# Altium PCB poyu.pcbdoc (part 1 of 2)
Units mm, origin at the board's own origin, x right, y up, seen from the top; angles counter-clockwise.
Board outline 44.28 x 42.46 mm, 4 copper layers (Top Layer, GND, VCC, Bottom Layer), stack 1.564 mm thick; 93 components, 51 nets, 337 pads, 150 vias.
Unrouted connection lines stored in the file: 71.
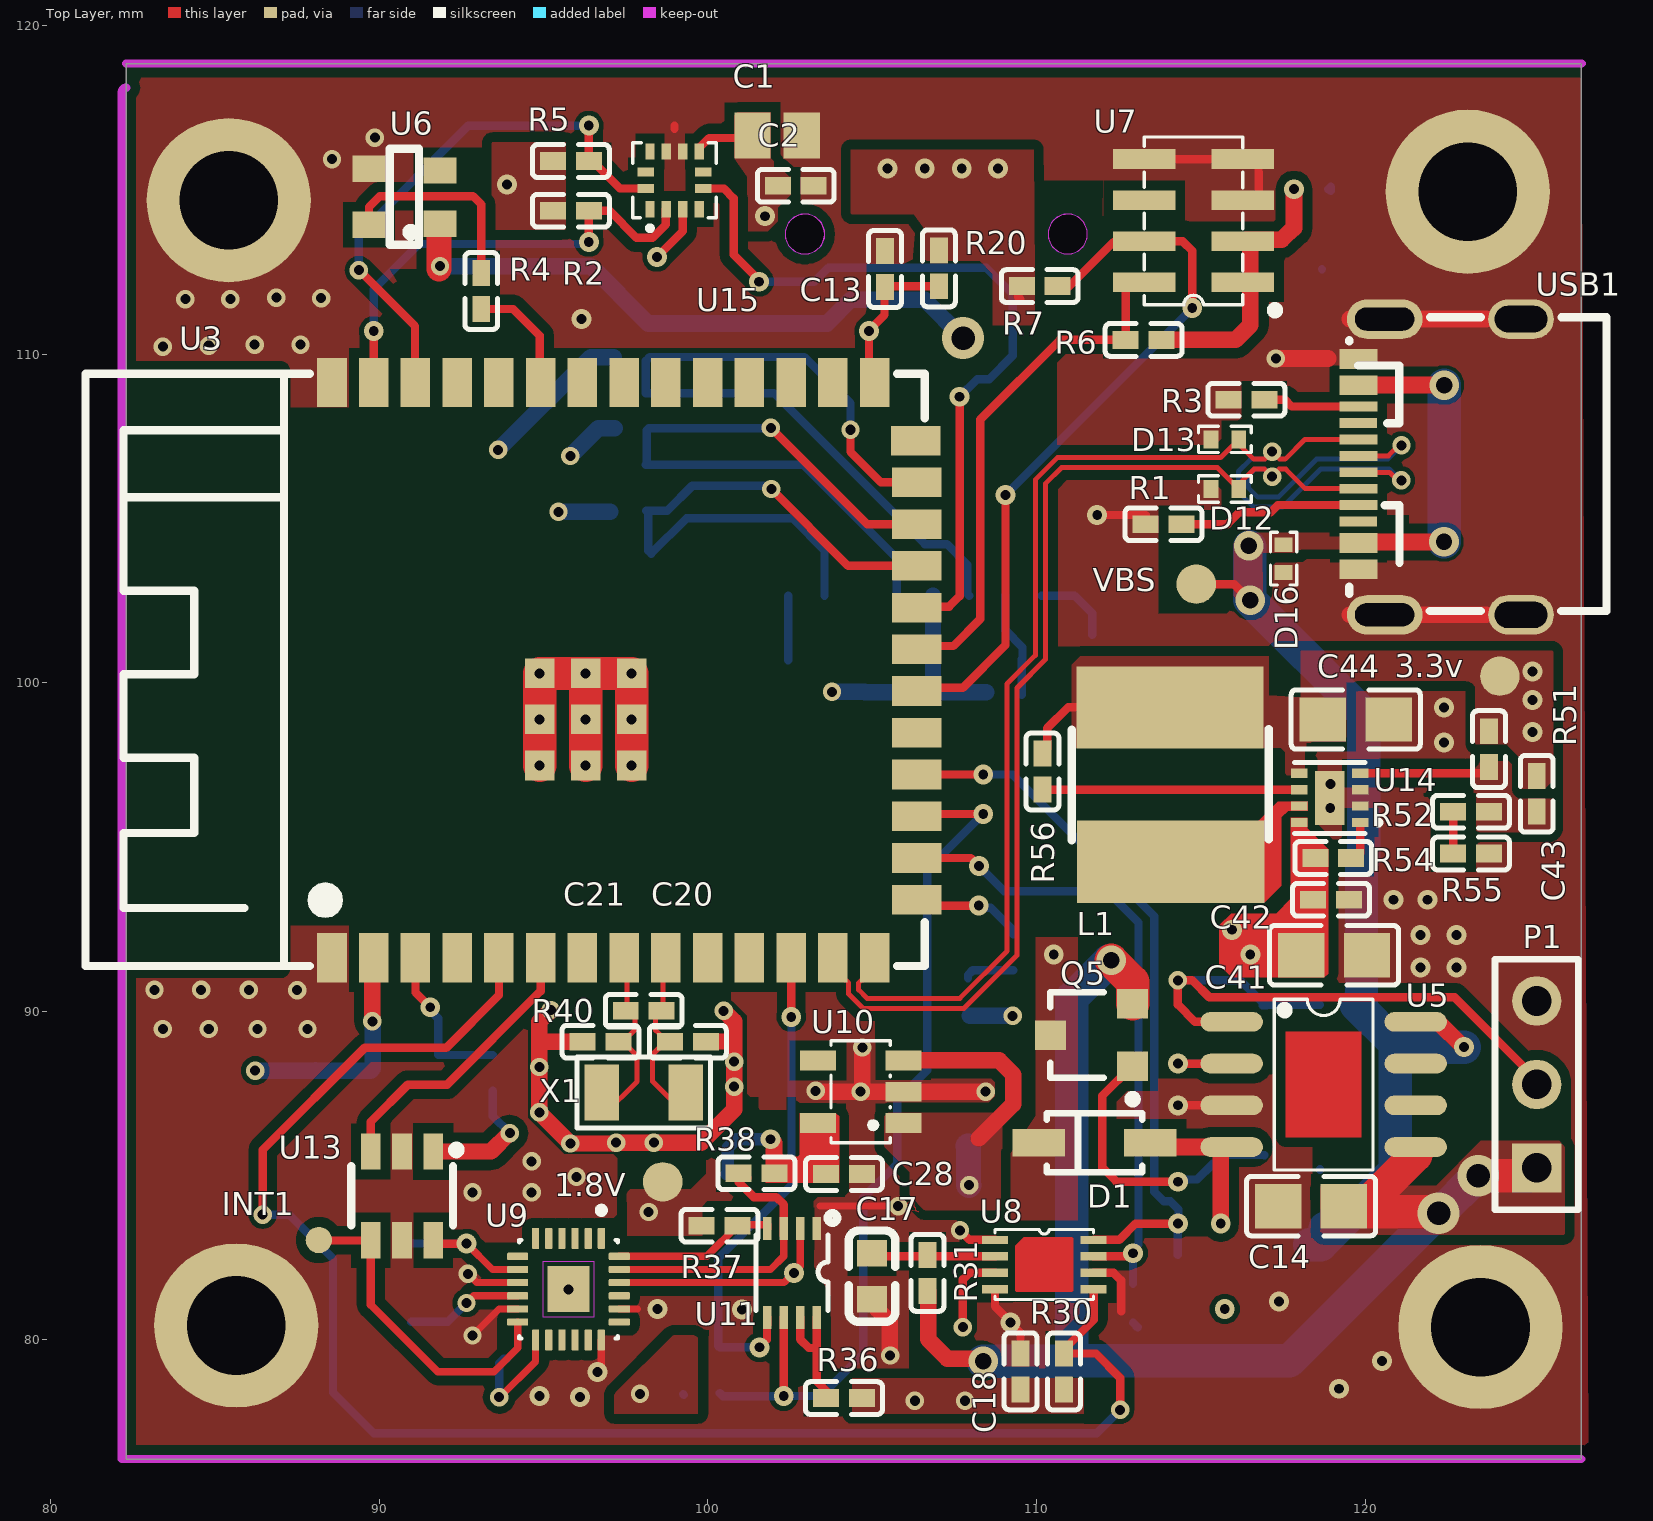
[diagram p0: Top Layer view]
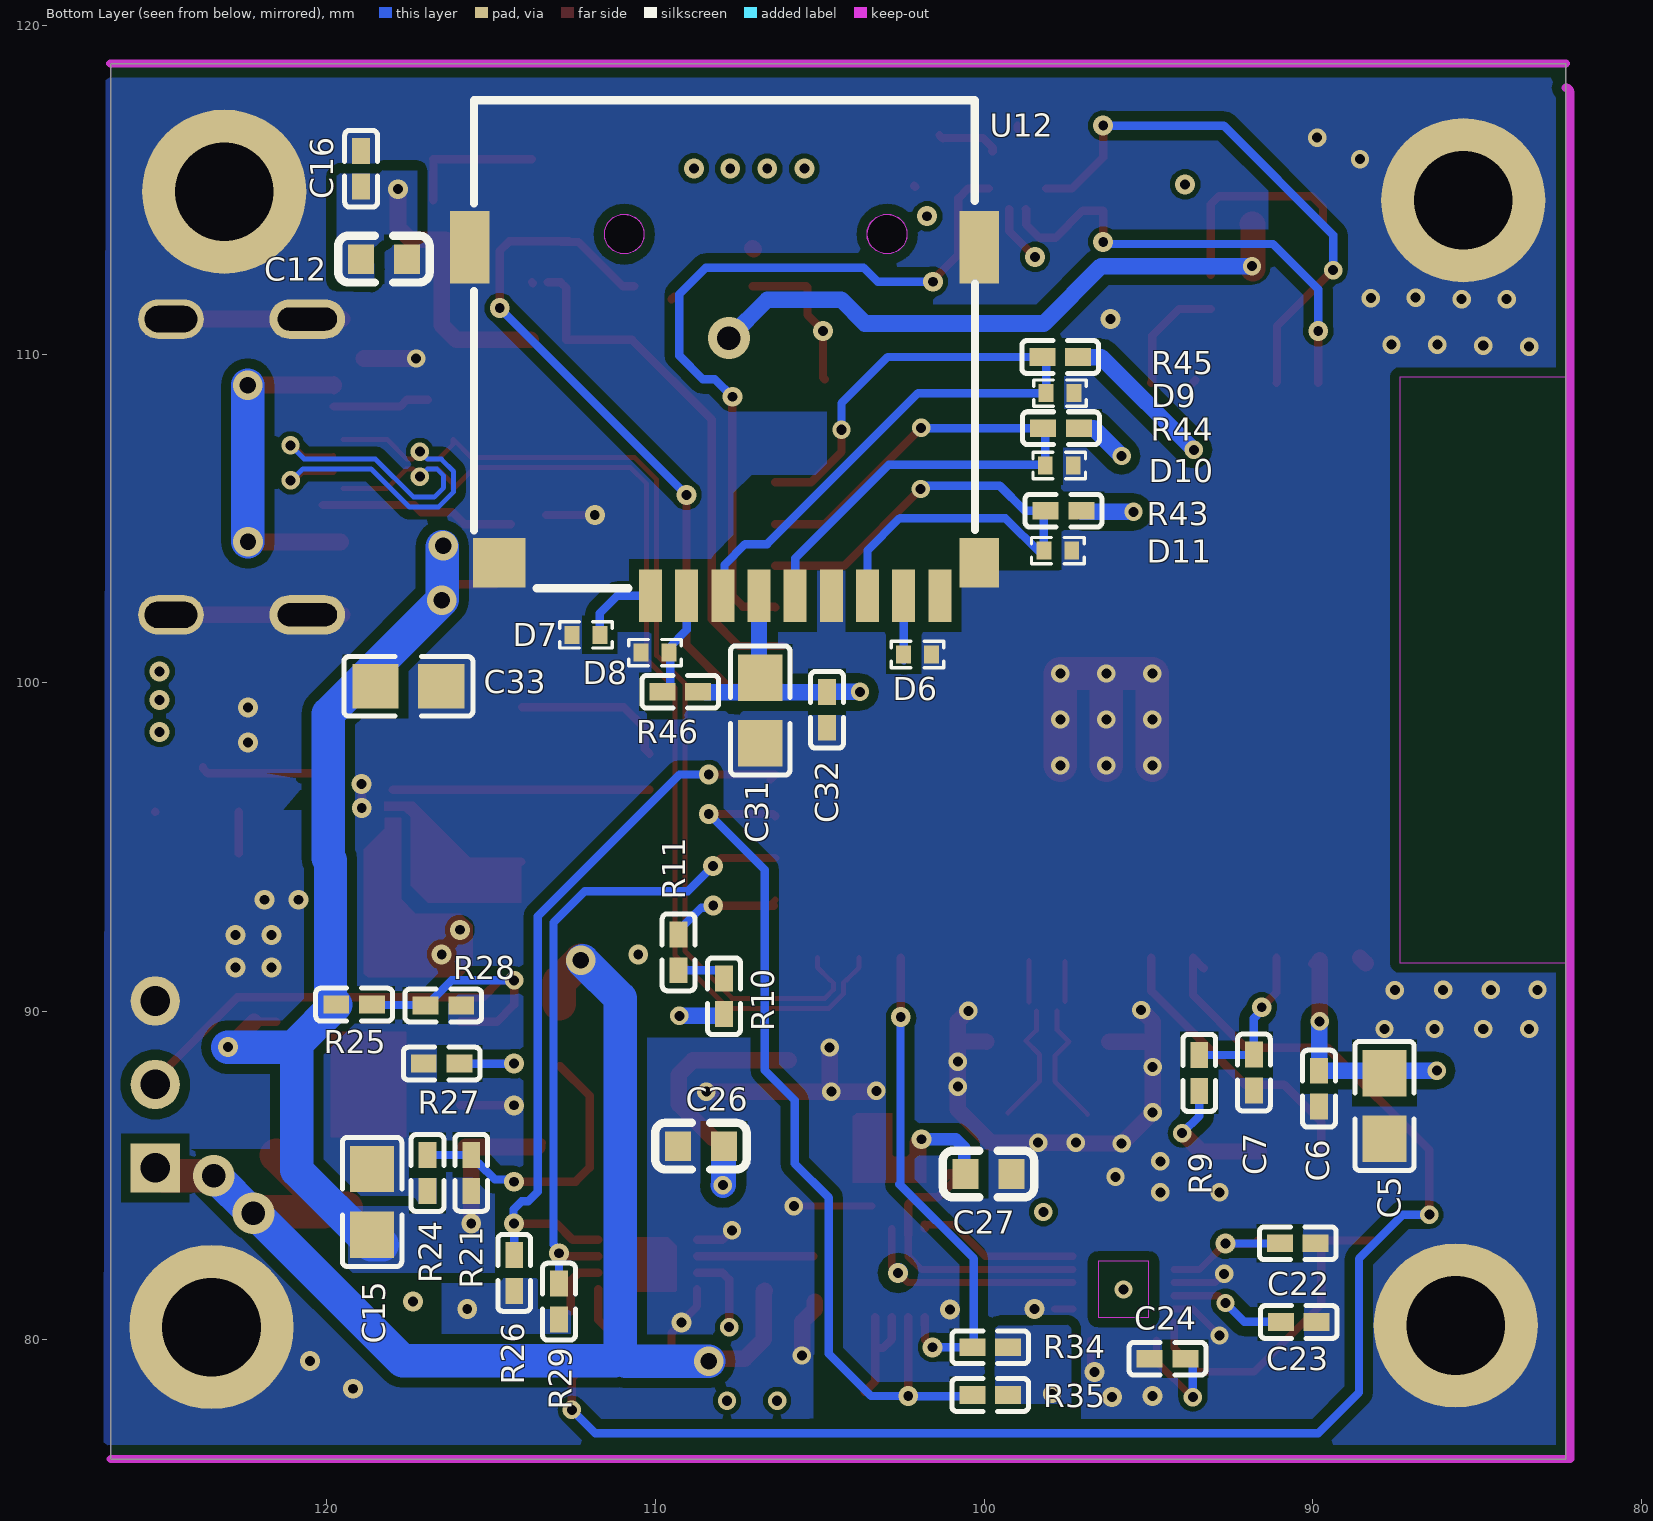
[diagram p1: Bottom Layer view, seen from below]
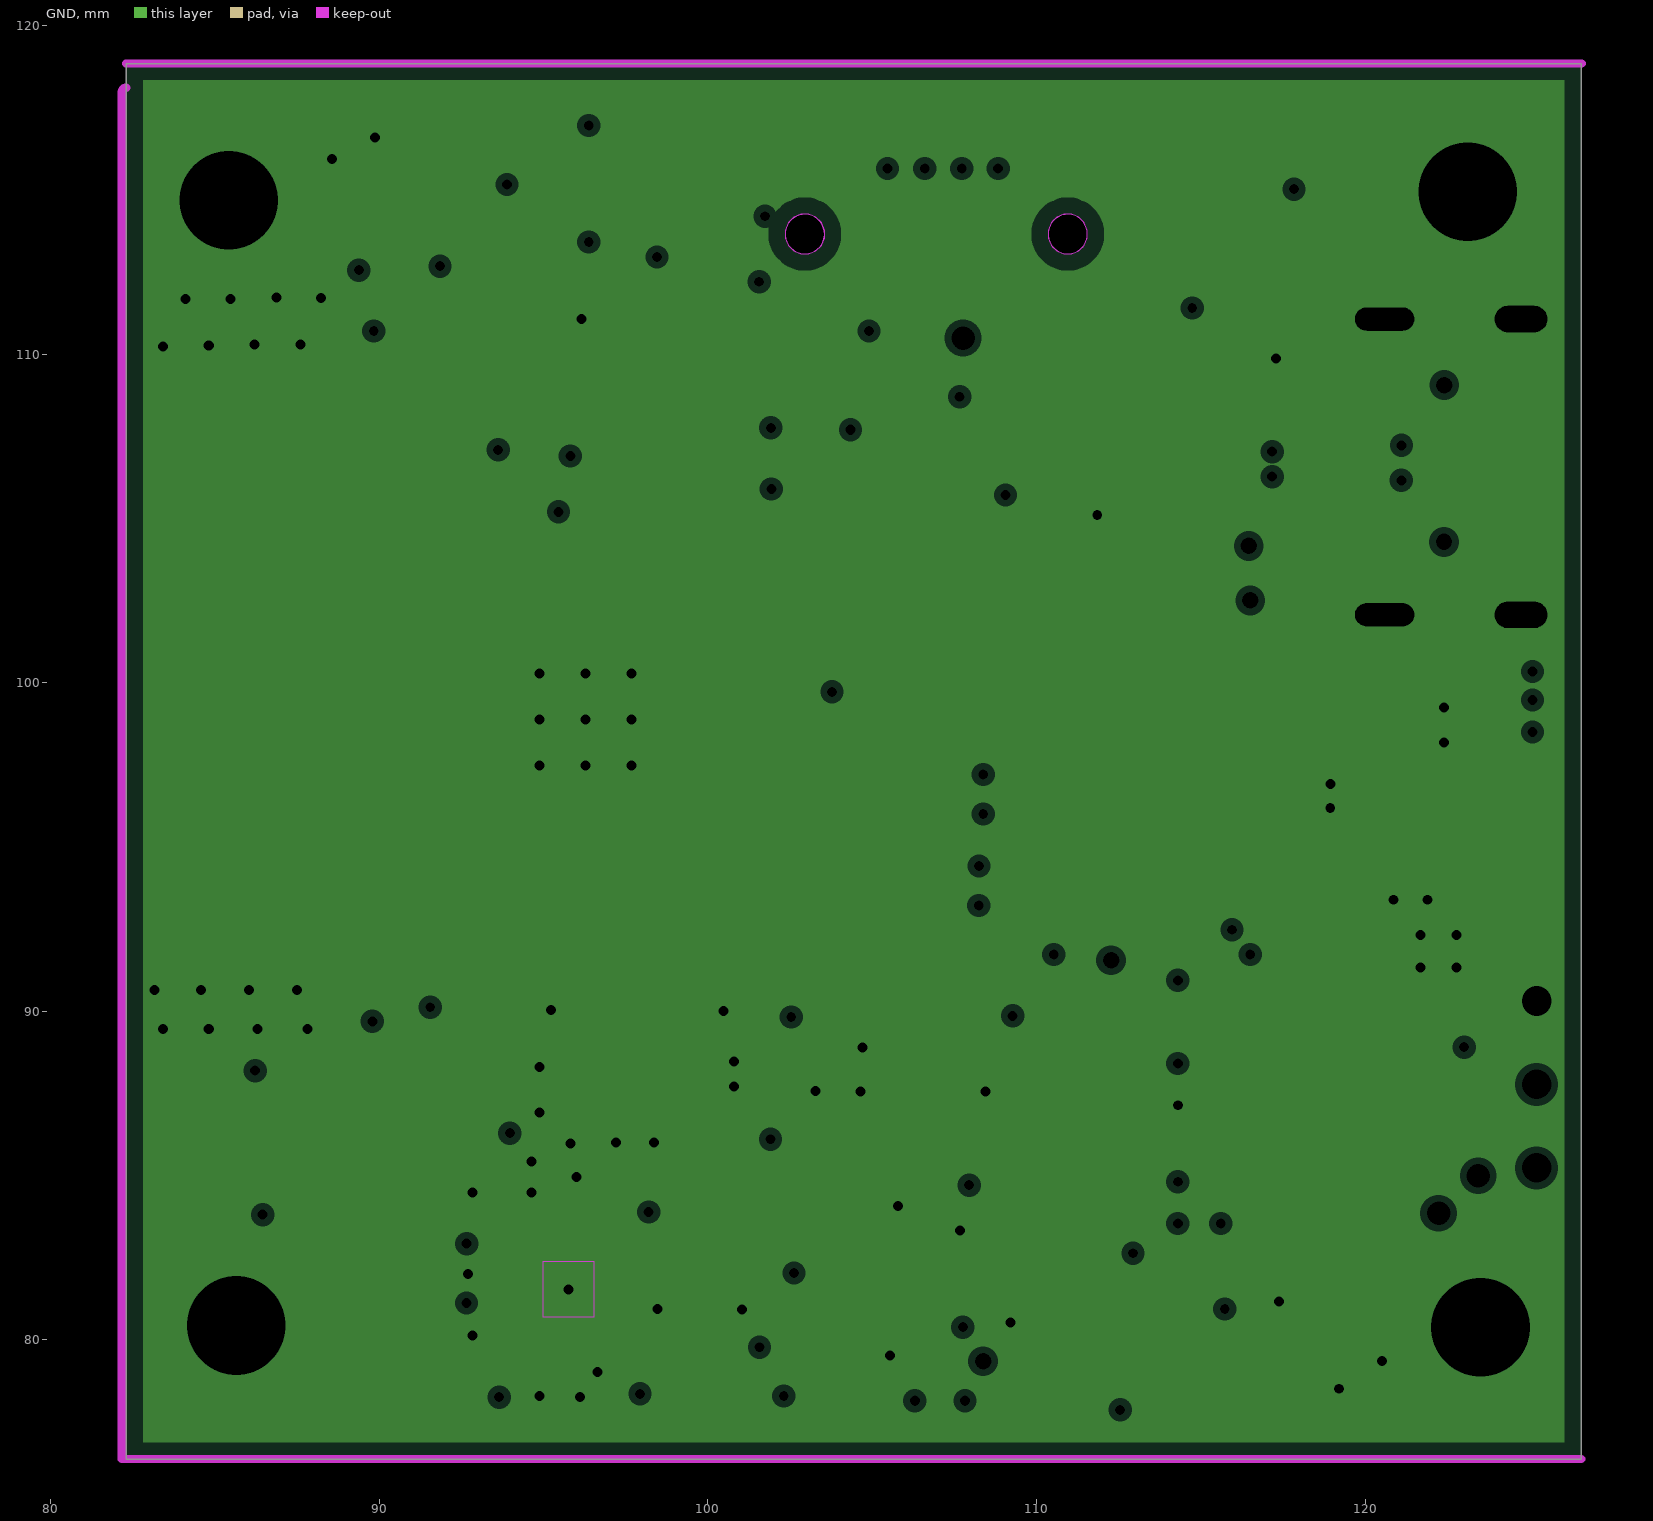
[diagram p2: GND, clearances drawn from the general rule]
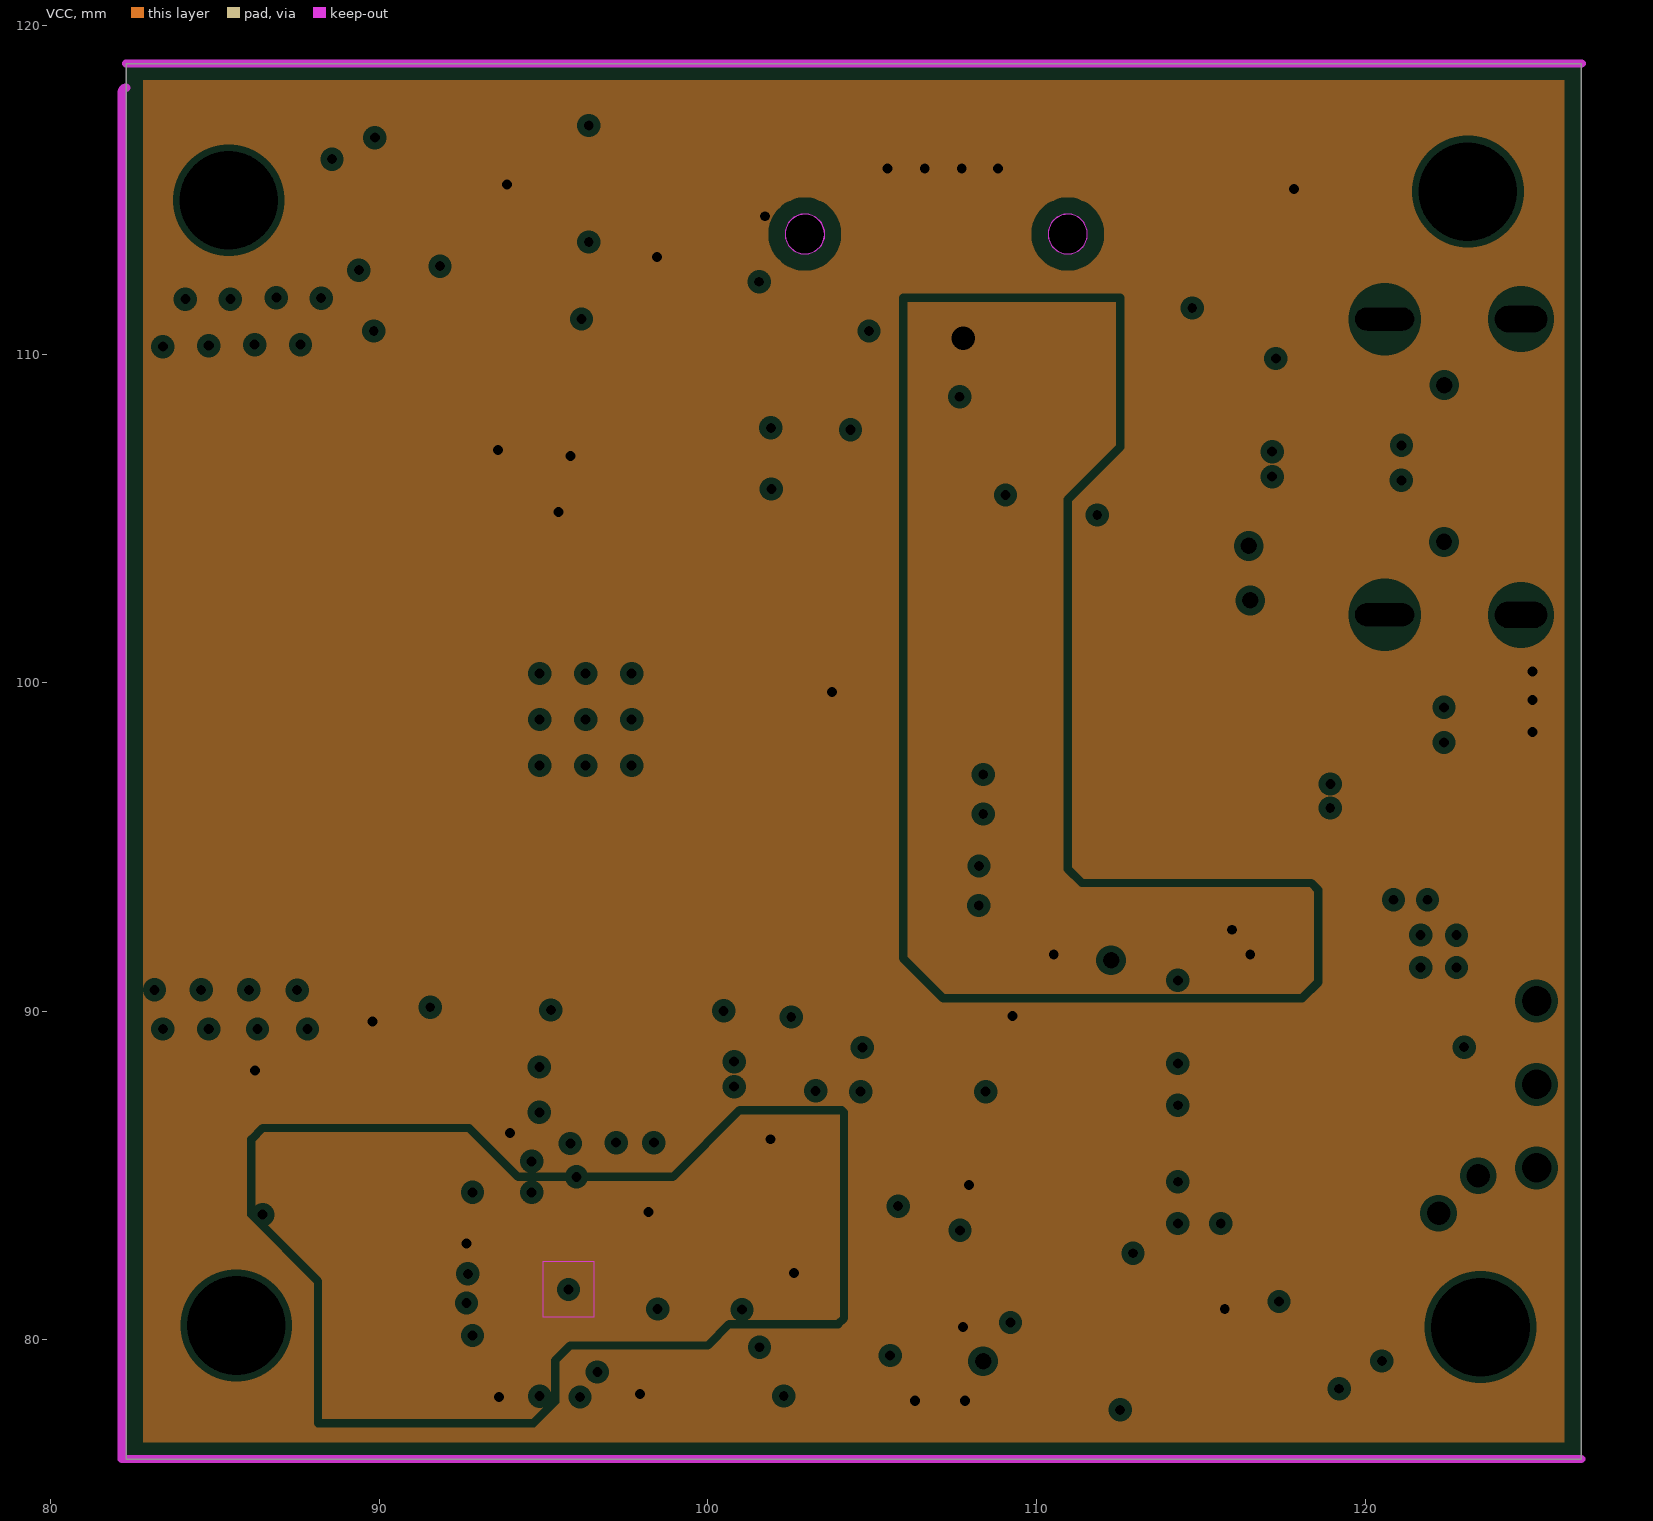
[diagram p3: VCC, clearances drawn from the general rule]

## Layer stack, top to bottom
Top Solder Mask Layer: solder mask 0.0102, Solder Resist, Dk 3.5
Top Layer: signal copper 0.035
Dielectric 1: prepreg 0.0993, PP-006, Dk 4.1
GND: plane copper 0.0152, net GND
Dielectric1: dielectric 1.2649, FR-4, Dk 4.8
VCC: plane copper 0.0152, net (Multiple Nets)
Dielectric 2: prepreg 0.0993, PP-006, Dk 4.1
Bottom Layer: signal copper 0.035
Bottom Solder Mask Layer: solder mask 0.0102, Solder Resist, Dk 3.5

## Board outline
82.296,76.378 126.576,76.378 126.576,118.842 82.296,118.842

## Design rules (kind name [scope] priority, off if disabled: settings)
Clearance KEEPOUT-PAD-100mil [OnLayer('Keep-Out Layer') vs ispad] p1 off: gap=2.54 ignorepadtopadclearanceinfootprint=FALSE except(0: Arc-Hole Track-Hole SMDPad-Hole THPad-Hole Via-Hole Fill-Hole Poly-Hole Region-Hole Text-Hole)
Clearance VIA-VIA-18mil [isVIA >(InDifferentialPairClass('All Differential Pairs')or  InNet('GND') ) vs isVIA] p2 off: gap=0.457 ignorepadtopadclearanceinfootprint=FALSE except(0: Arc-Hole Track-Hole SMDPad-Hole THPad-Hole Via-Hole Fill-Hole Poly-Hole Region-Hole Text-Hole)
Clearance KEEPOULAYER-ALL-20mil [OnLayer('Keep-Out Layer')] p3: gap=0.508 ignorepadtopadclearanceinfootprint=FALSE except(0: Arc-Hole Track-Hole SMDPad-Hole THPad-Hole Via-Hole Fill-Hole Poly-Hole Region-Hole Text-Hole)
Clearance BOTTOMPADS-4MM [(InComponentClass('Top Side Components')) and  (OnLayer('Multi-Layer')) vs OnLayer('Bottom Layer') And IsPad] p4 off: gap=4.064 ignorepadtopadclearanceinfootprint=FALSE except(0: Arc-Hole Track-Hole SMDPad-Hole THPad-Hole Via-Hole Fill-Hole Poly-Hole Region-Hole Text-Hole)
Clearance room_bga_3.9mil [withinroom('bga_3.9mil')] p5 off: gap=0.102 ignorepadtopadclearanceinfootprint=FALSE except(0: Arc-Hole Track-Hole SMDPad-Hole THPad-Hole Via-Hole Fill-Hole Poly-Hole Region-Hole Text-Hole)
Clearance 3W>dif>pwr--12MIL [istrack  >(InDifferentialPairClass('All Differential Pairs')or InNetClass('pwr') ) vs istrack  >(InDifferentialPairClass('All Differential Pairs')or InNetClass('pwr') )] p6 off: gap=0.305 ignorepadtopadclearanceinfootprint=FALSE except(0: Arc-Hole Track-Hole SMDPad-Hole THPad-Hole Via-Hole Fill-Hole Poly-Hole Region-Hole Text-Hole)
Clearance CLK--16MIL [InNetClass('CLK')] p7 off: gap=0.406 ignorepadtopadclearanceinfootprint=FALSE except(0: Arc-Hole Track-Hole SMDPad-Hole THPad-Hole Via-Hole Fill-Hole Poly-Hole Region-Hole Text-Hole)
Clearance inpoly-isvia--6MIL [inpoly vs isvia] p8: gap=0.152 ignorepadtopadclearanceinfootprint=FALSE except(0: Arc-Hole Track-Hole SMDPad-Hole THPad-Hole Via-Hole Fill-Hole Poly-Hole Region-Hole Text-Hole)
Clearance inpoly-all--12MIL [inpoly] p9: gap=0.305 ignorepadtopadclearanceinfootprint=FALSE except(0: Arc-Hole Track-Hole SMDPad-Hole THPad-Hole Via-Hole Fill-Hole Poly-Hole Region-Hole Text-Hole)
Clearance all--6MIL [All] p10: gap=0.152 ignorepadtopadclearanceinfootprint=FALSE except(0: Arc-Hole Track-Hole SMDPad-Hole THPad-Hole Via-Hole Fill-Hole Poly-Hole Region-Hole Text-Hole)
Clearance ALL-5MIL [All] p11 off: gap=0.127 ignorepadtopadclearanceinfootprint=FALSE except(0: Arc-Hole Track-Hole SMDPad-Hole THPad-Hole Via-Hole Fill-Hole Poly-Hole Region-Hole Text-Hole)
Clearance ALL-4MIL [All] p12 off: gap=0.102 ignorepadtopadclearanceinfootprint=FALSE except(0: Arc-Hole Track-Hole SMDPad-Hole THPad-Hole Via-Hole Fill-Hole Poly-Hole Region-Hole Text-Hole)
Clearance poly-4mil [InPolygonClass('Poly-4mil')] p13 off: gap=0.102 ignorepadtopadclearanceinfootprint=FALSE except(0: Arc-Hole Track-Hole SMDPad-Hole THPad-Hole Via-Hole Fill-Hole Poly-Hole Region-Hole Text-Hole)
DiffPairsRouting DiffPair_DiffPairsRouting [All] p1: maxlimit=0.152 minlimit=0.152 mostfreqgap=0.152 toplayer_minwidth=0.152 toplayer_maxwidth=0.152 toplayer_prefwidth=0.152 bottomlayer_minwidth=0.152 bottomlayer_maxwidth=0.152 bottomlayer_prefwidth=0.152 maxuncoupledlength=12.7
DiffPairsRouting USBD_DiffPairsRouting [InDifferentialPair ('USBD')] p2: maxlimit=0.152 minlimit=0.152 mostfreqgap=0.152 toplayer_minwidth=0.152 toplayer_maxwidth=0.152 toplayer_prefwidth=0.152 bottomlayer_minwidth=0.152 bottomlayer_maxwidth=0.152 bottomlayer_prefwidth=0.152 maxuncoupledlength=12.7
DiffPairsRouting 90oum [All] p3: maxlimit=0.254 minlimit=0.254 mostfreqgap=0.254 toplayer_minwidth=0.381 toplayer_maxwidth=0.381 toplayer_prefwidth=0.381 bottomlayer_minwidth=0.381 bottomlayer_maxwidth=0.381 bottomlayer_prefwidth=0.381 maxuncoupledlength=12.7
DiffPairsRouting 100oum [All] p4: maxlimit=0.254 minlimit=0.254 mostfreqgap=0.254 toplayer_minwidth=0.381 toplayer_maxwidth=0.381 toplayer_prefwidth=0.381 bottomlayer_minwidth=0.381 bottomlayer_maxwidth=0.381 bottomlayer_prefwidth=0.381 maxuncoupledlength=12.7
FabricationTestPointUsage TestPointUsage [All] p1: valid=0 allowmultiple=FALSE
FabricationTestpoint Testpoint [All] p1: side=3 testpointundercomponent=TRUE minsize=1.016 maxsize=2.54 preferedsize=1.524 minholesize=0 maxholesize=1.016 preferedholesize=0.813 testpointgrid=0.025 allowsidetop=TRUE allowsidebottom=TRUE usegrid=TRUE gridtolerance=0
MatchedLengths DiffPair_MatchedLengths [All] p1: tolerance=25.4 checknetsindiffpair=TRUE checkdiffpairvsdiffpair=FALSE checkxsignals=FALSE checkothers=FALSE
MatchedLengths USBD_MatchedLengths [InDifferentialPair ('USBD')] p2: tolerance=25.4 checknetsindiffpair=TRUE checkdiffpairvsdiffpair=FALSE checkxsignals=FALSE checkothers=FALSE
MatchedLengths USBD_MatchedLengths_1 [InDifferentialPair ('USBD')] p3: tolerance=25.4 checknetsindiffpair=FALSE checkdiffpairvsdiffpair=TRUE checkxsignals=TRUE checkothers=TRUE
MatchedLengths USBD_MatchedLengths_2 [InDifferentialPair ('USBD')] p4: tolerance=25.4 checknetsindiffpair=TRUE checkdiffpairvsdiffpair=FALSE checkxsignals=FALSE checkothers=FALSE
MatchedLengths XTALD_MatchedLengths [InDifferentialPairClass('XTALD')] p5: tolerance=0.178 checknetsindiffpair=TRUE checkdiffpairvsdiffpair=FALSE checkxsignals=FALSE checkothers=FALSE
MatchedLengths DiffPair_USBDMatchedLengths [InDifferentialPair ('PWR')] p6: tolerance=0.127 checknetsindiffpair=TRUE checkdiffpairvsdiffpair=FALSE checkxsignals=FALSE checkothers=FALSE
MatchedLengths DiffPair_USBDMatchedLengths_1 [InDifferentialPairClass('USBD')] p7: tolerance=0.254 checknetsindiffpair=TRUE checkdiffpairvsdiffpair=FALSE checkxsignals=FALSE checkothers=FALSE
MatchedLengths DiffPair_XTALDMatchedLengths [InDifferentialPair ('XTALD')] p8: tolerance=0.254 checknetsindiffpair=TRUE checkdiffpairvsdiffpair=FALSE checkxsignals=FALSE checkothers=FALSE
MatchedLengths DiffPair_XTALMatchedLengths [InDifferentialPair ('XTALD')] p9: tolerance=0.254 checknetsindiffpair=TRUE checkdiffpairvsdiffpair=FALSE checkxsignals=FALSE checkothers=FALSE
MatchedLengths MatchedLengths_2 [InDifferentialPair ('USB_D')] p10: tolerance=25.4 checknetsindiffpair=FALSE checkdiffpairvsdiffpair=TRUE checkxsignals=TRUE checkothers=TRUE
MatchedLengths DiffPair_USBMatchedLengths [InDifferentialPair ('USB_D')] p11: tolerance=0.254 checknetsindiffpair=TRUE checkdiffpairvsdiffpair=FALSE checkxsignals=FALSE checkothers=FALSE
MatchedLengths [InDifferentialPair ('USB_D')] p12: tolerance=25.4 checknetsindiffpair=FALSE checkdiffpairvsdiffpair=TRUE checkxsignals=TRUE checkothers=TRUE
MatchedLengths USBDMatchedLengths [InDifferentialPair ('USBD')] p13: tolerance=0.254 checknetsindiffpair=TRUE checkdiffpairvsdiffpair=FALSE checkxsignals=FALSE checkothers=FALSE
MatchedLengths MatchedLengths_1 [InDifferentialPair ('USB_D')] p14: tolerance=25.4 checknetsindiffpair=FALSE checkdiffpairvsdiffpair=TRUE checkxsignals=TRUE checkothers=TRUE
PlaneClearance [All] p1: clearance=0.203
PlaneConnect PlaneConnect_PWR [All] p1: planeconnectstyle=Relief reliefexpansion=0.254 reliefentries=4 reliefconductorwidth=0.305 reliefairgap=0.254
PlaneConnect PlaneConnect_ALL [All] p2: pad.planeconnectstyle=Direct pad.reliefexpansion=0.508 pad.reliefentries=4 pad.reliefconductorwidth=0.254 pad.reliefairgap=0.254 via.planeconnectstyle=Relief via.reliefexpansion=0.508 via.reliefentries=4 via.reliefconductorwidth=0.254 via.reliefairgap=0.254
PolygonConnect [All] p1: connectstyle=Direct reliefconductorwidth=0.254 reliefentries=4 polygonreliefangle="90 Angle" airgapwidth=0.254
RoutingVias [All] p1: holewidth=0.3 width=0.605 viastyle="Through Hole" minholewidth=0.3 minwidth=0.6 maxholewidth=1.27 maxwidth=2.54
SolderMaskExpansion [IsVia] p1: expansion=0.102 istentingtop=TRUE
Width PWR [InNetClass('PWR')] p1: maxlimit=1.27 minlimit=0.152 preferedwidth=0.762
Width [All] p2: maxlimit=2.54 minlimit=0.152 preferedwidth=0.254 minimp=50.000000 maximp=50.000000 favimp=50.000000
25 further rules are at their usual default settings.

## Components (designator, comment, footprint, x,y, rotation, side; value= is the part's Value field where it differs from the comment)
1.8V "TP" TP0.8#1 98.627,84.813 r180 top
3.3v "TP" TP0.8#2 124.363,99.735 r180 top
C1 "Cap" C0805#1 102.107,116.656 r180 top value=10uF
C2 "Cap" C0402#1 102.674,115.119 r180 top value=100nF
C5 "Cap" C0805#2 87.817,87.122 r270 bottom value=10uF
C6 "Cap" C0402#1 89.81,87.648 r270 bottom value=104
C7 "Cap" C0402#1 91.79,88.138 r270 bottom value=1uF
C12 "Cap" C0603 118.262,112.89 r0 bottom value=2.2uF
C13 "Cap" C0402#1 105.389,112.588 r270 top value=100nF
C14 "Cap" C0805#2 118.353,84.074 r0 top value=10uF
C15 "Cap" C0805#2 118.624,84.201 r270 bottom value=10uF
C16 "Cap" C0402#1 118.957,115.64 r270 bottom value=104
C17 "Cap" C0603 104.994,81.941 r90 top value=1uF
C18 "Cap" C0402#1 109.514,79.045 r270 top value=104
C20 "Cap" C0402#1 99.39,89.078 r180 top value=22pF
C21 "Cap" C0402#1 96.731,89.078 r0 top value=22pF
C22 "Cap" C0402#1 90.456,82.944 r0 bottom value=104
C23 "Cap" C0402#1 90.424,80.546 r0 bottom value=104
C24 "Cap" C0402#1 94.421,79.431 r180 bottom value=104
C26 "Cap" C0603 108.617,85.899 r0 bottom value=1uF
C27 "Cap" C0603 99.868,85.051 r180 bottom value=1uF
C28 "Cap" C0402#1 104.14,85.051 r0 top value=104
C31 "Cap" C0805#2 106.813,99.154 r90 bottom value=10uF
C32 "Cap" C0402#1 104.78,99.175 r90 bottom value=104
C33 "Cap" C0805#2 117.52,99.889 r180 bottom value=1uF
C41 "Cap" C0805#2 119.053,91.706 r180 top value=10uF
C42 "Cap" C0402#1 118.961,93.397 r180 top value=0.1uF
C43 "Cap" C0402#1 125.22,96.62 r270 top value=20pF
C44 "Cap" C0805#2 119.714,98.882 r0 top value=22uF
D1 "DSS26" 425 111.763,86.002 r0 top
D6 "RCLAMP0521T-ES" DFN1006-2L-BI 102.024,100.859 r0 bottom
D7 "RCLAMP0521T-ES" DFN1006-2L-BI 112.116,101.455 r180 bottom
D8 "RCLAMP0521T-ES" DFN1006-2L-BI 110.015,100.918 r180 bottom
D9 "RCLAMP0521T-ES" DFN1006-2L-BI 97.688,108.814 r0 bottom
D10 "RCLAMP0521T-ES" DFN1006-2L-BI 97.714,106.608 r0 bottom
D11 "RCLAMP0521T-ES" DFN1006-2L-BI 97.756,104.019 r0 bottom
D12 "RCLAMP0521T-ES" DFN1006-2L-BI 115.73,105.894 r0 top
D13 "RCLAMP0521T-ES" DFN1006-2L-BI 115.73,107.407 r0 top
D16 "RCLAMP0521T-ES" DFN1006-2L-BI 117.521,103.775 r270 top
INT1 "TP" TP0.8#3 88.161,83.041 r90 top
L1 "Inductor" IND-SMD_L6.0-W6.0_FNR60XXS 114.071,96.901 r90 top value=1uH
P1 "Lion" HDR1X3 125.22,85.236 r90 top
Q5 "CJ2301" SOT-23 111.672,89.279 r90 top
R1 "5.1K" C0402#1 113.864,104.825 r180 top
R2 "5.1K" C0402#1 95.832,114.363 r0 top value=4.7K
R3 "5.1K" C0402#1 116.386,108.614 r0 top
R4 "5.1K" C0402#1 93.105,111.919 r90 top value=0
R5 "5.1K" C0402#1 95.832,115.875 r0 top value=4.7K
R6 "5.1K" C0402#1 113.259,110.432 r0 top value=10K
R7 "5.1K" C0402#1 110.096,112.069 r180 top value=10K
R9 "5.1K" C0402#2 93.451,88.127 r270 bottom value=10K
R10 "5.1K" C0402#1 107.916,90.46 r270 bottom value=10K
R11 "5.1K" C0402#1 109.296,91.796 r90 bottom value=0
R20 "10K" C0402#1 107.029,112.609 r270 top
R21 "5.1K" C0402#1 115.603,85.086 r90 bottom value=0
R24 "5.1K" C0402#1 116.937,85.079 r270 bottom value=10K
R25 "5.1K" C0402#1 119.169,90.205 r0 bottom value=2.7K
R26 "5.1K" C0402#1 114.3,82.042 r270 bottom value=10K
R27 "5.1K" C0402#1 116.505,88.411 r0 bottom value=2.4K
R28 "5.1K" C0402#1 116.455,90.18 r0 bottom value=16K
R29 "5.1K" C0402#1 112.937,81.167 r270 bottom value=10K
R30 "5.1K" C0402#1 110.835,79.043 r270 top value=4.7K
R31 "5.1K" C0402#1 106.68,82.042 r90 top value=1K
R34 "5.1K" C0402#1 99.815,79.777 r0 bottom value=4.7K
R35 "5.1K" C0402#1 99.815,78.327 r0 bottom value=4.7K
R36 "5.1K" C0402#1 104.14,78.232 r0 top value=200K
R37 "5.1K" C0402#1 100.355,83.478 r0 top value=4.7K
R38 "5.1K" C0402#1 101.481,85.074 r180 top value=4.7K
R40 "5.1K" C0402#1 98.045,90.018 r180 top value=5.1M
R43 "5.1K" C0402#1 97.584,105.236 r0 bottom value=51K
R44 "5.1K" C0402#1 97.66,107.747 r0 bottom value=51K
R45 "5.1K" C0402#1 97.683,109.91 r0 bottom value=51K
R46 "5.1K" C0402#1 109.245,99.722 r0 bottom value=51K
R51 "Res1" C0402#1 123.768,97.979 r270 top value=245K
R52 "Res1" C0402#1 123.223,96.075 r0 top value=39K
R54 "Res1" C0402#1 119.028,94.667 r180 top value=10K
R55 "Res1" C0402#1 123.223,94.805 r0 top value=200
R56 "Res1" C0402#1 110.18,97.298 r270 top value=180K
U3 "MCU" WIRELM-SMD_ESP32-S3-WROOM-1 97.456,100.382 r90 top
U5 "PW4056HH" SOP8_L 118.737,87.776 r0 top
U6 "XL2121RGBC" SMD-4P 92.989,113.963 r90 top
U7 "MS5611" SOP8_5611 114.778,114.089 r180 top
U8 "MAX17043" MAX17043 110.236,82.296 r0 top
U9 "ICM-20948" QFN40P300X300X105-24N 95.758,81.546 r270 top
U10 "RT9013-18GB" SOT-23-5_L3.0-W1.7-P0.95-LS2.8-BR 104.648,87.556 r0 top
U11 "PCA9306DCUR" SSOP-8_L2.0-W2.3-P0.50-LS3.1-BR 102.56,82.042 r90 top
U12 "XKTF-015-N" TF-SMD_XKTF-015-N 107.899,107.95 r0 bottom
U13 "SN74AVC1T45DBVR" SOT-23-6_L2.9-W1.6-P0.95-LS2.8-BR 90.695,84.387 r90 top
U14 "SGM61022XTDE8G/TR" DFN-8_L2.0-W2.0-P0.50-BL-EP 118.923,96.495 r90 top
U15 "SC7A22H" LGA-12_L2.0-W2.0-P0.50-BL 98.986,115.289 r0 top
USB1 "USBC" USB-C-SMD_TYPE-C-USB-5 122.268,106.566 r90 top
VBS "TP" TP0.8#4 114.859,101.599 r180 top
X1 "32.768kHz" OSC-SMD_L3.2-W1.5 98.044,87.526 r0 top

## Footprints (in the part's own frame and the unit in brackets; to place one, negate y for a bottom-side part, rotate by r counter-clockwise, add the part's x,y. Pads: shape width x height; smd on the part's side, far side on the other; paste and mask are expansions set on the pad)
425 [mm]
  rect 1.6x0.85 smd: 1(-1.7,0) 2(1.7,0)
  silkscreen extent -1.45,-0.9 1.45,0.9
C0402#1 [mm]
  rect 0.79x0.54 smd paste-100 mask+0.051: 1(-0.545,0) 2(0.545,0)
  silkscreen extent -1.17,-0.5 1.17,0.5
C0402#2 [mm]
  rect 0.79x0.54 smd paste-100 mask+0.051: 1(-0.545,0)
  rect 0.79x0.54 smd paste+0 mask+0.051: 2(0.545,0)
  silkscreen extent -1.17,-0.5 1.17,0.5
C0603 [mm]
  rect 0.8x0.9 smd: 1(-0.7,0) 2(0.7,0)
  silkscreen extent -1.39,-0.71 1.39,0.71
C0805#1 [mm] "Chip Capacitor, Body 2.0x1.3mm, IPC High Density"
  rect 1.1x1.4 smd: 1(-0.75,0) 2(0.75,0)
  body extent -1.1,-0.72 1.1,0.72, height 1.4
C0805#2 [mm]
  rect 1.41x1.35 smd paste-100 mask+0.051: 1(-1,0) 2(1,0)
  silkscreen extent -1.96,-0.9 1.96,0.9
DFN1006-2L-BI [mm]
  rect 0.45x0.55 smd: 1(-0.425,0) 2(0.425,0)
  silkscreen extent -0.8,-0.4 0.8,0.4
DFN-8_L2.0-W2.0-P0.50-BL-EP [mm]
  rect 0.28x0.505 smd: 1(-0.75,-0.928) 2(-0.25,-0.928) 3(0.25,-0.928) 4(0.75,-0.928) 5(0.75,0.928) 6(0.25,0.928) 7(-0.25,0.928) 8(-0.75,0.928)
  rect 1.65x0.9 smd: 9(0,0)
  silkscreen extent -1.08,-1.55 1.08,1.08
HDR1X3 [mm] "Connector; Header; 3 Position"
  rect 1.5x1.5 hole 0.9: 1(0,0)
  round 1.5 hole 0.9: 2(2.54,0) 3(5.08,0)
  silkscreen extent -1.27,-1.27 6.35,1.27
IND-SMD_L6.0-W6.0_FNR60XXS [mm]
  rect 2.5x5.7 smd: 1(-2.35,-0.013) 2(2.35,0.013)
  silkscreen extent -1.69,-3 1.69,3
LGA-12_L2.0-W2.0-P0.50-BL [mm]
  rect 0.28x0.5 smd paste+0.051: 1(-0.75,-0.875) 2(-0.25,-0.875) 3(0.25,-0.875) 4(0.75,-0.875) 7(0.75,0.875) 8(0.25,0.875) 9(-0.25,0.875) 10(-0.75,0.875)
  rect 0.5x0.28 smd paste+0.051: 5(0.875,-0.25) 6(0.875,0.25) 11(-0.875,0.25) 12(-0.875,-0.25)
  silkscreen extent -1.27,-1.53 1.27,1.14
MAX17043 [mm]
  rect 0.8x0.25 smd: 1(-1.5,0.75) 2(-1.5,0.25) 3(-1.5,-0.25) 4(-1.5,-0.75) 5(1.5,-0.75) 6(1.5,-0.25) 7(1.5,0.25) 8(1.5,0.75)
  Top Layer region: -0.838,0.508 -0.605,0.787 0.838,0.787 0.838,-0.787 -0.838,-0.787
  Top Layer lines w0.1: -0.838,-0.787 -0.838,0.508 -0.838,0.555 -0.605,0.787 0.838,0.787 0.838,-0.787 -0.838,-0.787
  silkscreen extent -1.5,-1.07 1.5,1.07
OSC-SMD_L3.2-W1.5 [mm]
  rect 1.05x1.7 smd: 1(-1.275,0) 2(1.275,0)
  silkscreen extent -2.03,-1.08 2.03,1.08
QFN40P300X300X105-24N [mm]
  rrect25% 0.64x0.22 smd: 1(-1.545,1) 2(-1.545,0.6) 3(-1.545,0.2) 4(-1.545,-0.2) 5(-1.545,-0.6) 6(-1.545,-1) 13(1.545,-1) 14(1.545,-0.6) 15(1.545,-0.2) 16(1.545,0.2) 17(1.545,0.6) 18(1.545,1)
  rrect25% 0.22x0.64 smd: 7(-1,-1.545) 8(-0.6,-1.545) 9(-0.2,-1.545) 10(0.2,-1.545) 11(0.6,-1.545) 12(1,-1.545) 19(1,1.545) 20(0.6,1.545) 21(0.2,1.545) 22(-0.2,1.545) 23(-0.6,1.545) 24(-1,1.545)
  rect 1.397x1.27 smd: 25(0,0)
  Board Outline Layer region: 0.85,-0.77 -0.85,-0.77 -0.85,0.77 0.85,0.77
  silkscreen extent -2.5,-1.5 1.5,1.5, body extent -1.5,-1.5 1.5,1.5, height 1
SMD-4P [mm]
  rect 0.8x1 smd: 1(0,1.143) 2(1.626,1.143) 3(-0.025,3.302) 4(1.676,3.302)
  silkscreen extent -0.64,1.78 2.29,2.67
SOP8_5611 [mm]
  rect 1.9x0.6 smd: 1(-1.5,1.905) 2(-1.5,0.655) 3(-1.5,-0.595) 4(-1.5,-1.845) 5(1.5,-1.845) 6(1.5,-0.595) 7(1.5,0.655) 8(1.5,1.905)
  silkscreen extent -2.6,-2.51 1.5,2.88
SOP8_L [mm]
  oval 1.9x0.6 smd: 1(-2.8,1.905) 2(-2.8,0.635) 3(-2.8,-0.635) 4(-2.8,-1.905) 5(2.8,-1.905) 6(2.8,-0.635) 7(2.8,0.635) 8(2.8,1.905)
  Top Layer region: -1.15,1.6 1.15,1.6 1.15,-1.6 -1.15,-1.6
  silkscreen extent -1.5,-2.6 1.5,2.6
SOT-23 [mm]
  rect 0.9x0.95 smd: 1(-0.95,-1.25) 2(0.95,-1.25) 3(0,1.25)
  silkscreen extent -2.07,-1.38 1.3,1.25
SOT-23-5_L3.0-W1.7-P0.95-LS2.8-BR [mm]
  rect 1.1x0.6 smd: 1(1.3,-0.95) 2(1.3,0) 3(1.3,0.95) 4(-1.3,0.95) 5(-1.3,-0.95)
  silkscreen extent -0.9,-1.55 0.9,1.55
SOT-23-6_L2.9-W1.6-P0.95-LS2.8-BR [mm]
  rect 1.1x0.6 smd paste+0 mask+0.051: 1(1.35,-0.95) 2(1.35,0) 3(1.35,0.95) 4(-1.35,0.95) 5(-1.35,0) 6(-1.35,-0.95)
  silkscreen extent -0.9,-1.78 1.52,1.55
SSOP-8_L2.0-W2.3-P0.50-LS3.1-BR [mm]
  rect 0.7x0.26 smd: 1(1.35,-0.75) 2(1.35,-0.25) 3(1.35,0.25) 4(1.35,0.75) 5(-1.35,0.75) 6(-1.35,0.25) 7(-1.35,-0.25) 8(-1.35,-0.75)
  silkscreen extent -1.15,-1.37 1.81,1.1
TF-SMD_XKTF-015-N [mm]
  rect 0.7x1.6 smd: 1(2.25,5.3) 2(1.15,5.3) 3(0.05,5.3) 4(-1.05,5.3) 5(-2.15,5.3) 6(-3.25,5.3) 7(-4.35,5.3) 8(-5.45,5.3) 9(-6.55,5.3)
  rect 1.2x1.5 smd: 10(-7.75,4.3)
  rect 1.2x2.2 smd: 11(-7.75,-5.3) 13(7.75,-5.3)
  rect 1.6x1.5 smd: 12(6.85,4.3)
  Board Outline Layer board cut-out: 3.65,-5.7 3.65,-5.819 3.559,-6.04 3.39,-6.209 3.169,-6.3 2.931,-6.3 2.71,-6.209 2.541,-6.04 2.45,-5.819 2.45,-5.7 2.45,-5.581 2.541,-5.36 2.71,-5.191 2.931,-5.1 3.169,-5.1 3.39,-5.191 3.559,-5.36 3.65,-5.581 3.65,-5.7 3.65,-5.7
  Board Outline Layer board cut-out: -4.35,-5.7 -4.35,-5.819 -4.441,-6.04 -4.61,-6.209 -4.831,-6.3 -5.069,-6.3 -5.29,-6.209 -5.459,-6.04 -5.55,-5.819 -5.55,-5.7 -5.55,-5.581 -5.459,-5.36 -5.29,-5.191 -5.069,-5.1 -4.831,-5.1 -4.61,-5.191 -4.441,-5.36 -4.35,-5.581 -4.35,-5.7 -4.35,-5.7
  Board Outline Layer circle w0.025: c3.05,-5.7 r0.6
  Board Outline Layer circle w0.025: c-4.95,-5.7 r0.6
  Board Outline Layer region: 3.65,-5.7 3.65,-5.819 3.559,-6.04 3.39,-6.209 3.169,-6.3 2.931,-6.3 2.71,-6.209 2.541,-6.04 2.45,-5.819 2.45,-5.7 2.45,-5.581 2.541,-5.36 2.71,-5.191 2.931,-5.1 3.169,-5.1 3.39,-5.191 3.559,-5.36 3.65,-5.581 3.65,-5.7 3.65,-5.7
  Board Outline Layer region: -4.35,-5.7 -4.35,-5.819 -4.441,-6.04 -4.61,-6.209 -4.831,-6.3 -5.069,-6.3 -5.29,-6.209 -5.459,-6.04 -5.55,-5.819 -5.55,-5.7 -5.55,-5.581 -5.459,-5.36 -5.29,-5.191 -5.069,-5.1 -4.831,-5.1 -4.61,-5.191 -4.441,-5.36 -4.35,-5.581 -4.35,-5.7 -4.35,-5.7
  silkscreen extent -7.62,-9.78 7.62,5.08
TP0.8#1 [mm]
  round 1.2 smd: TP(0,0)
TP0.8#2 [mm]
  round 1.2 smd: TP(0.263,-0.465)
TP0.8#3 [mm]
  round 0.8 smd: TP(0,0)
TP0.8#4 [mm]
  round 1.2 smd: TP(0,-1.401)
USB-C-SMD_TYPE-C-USB-5 [mm]
  oval 1.2x2 hole 0.8 slot 1.6 at 90 deg: 0(-4.5,-2.475) 0(4.5,-2.475)
  oval 1.2x2.3 hole 0.7 slot 1.8 at 90 deg: 0(-4.5,1.675) 0(4.5,1.675)
  rect 0.3x1.15 smd: A1B12(-3.262,2.473) A4B9(-2.462,2.471) A4B9(-2.162,2.471) A5(-1.162,2.475) A6(-0.162,2.475) A7(0.337,2.473) B1A12(-2.963,2.473) B1A12(3.138,2.475) B1A12(3.438,2.475) B4A9(2.337,2.475) B4A9(2.638,2.475) B5(1.838,2.475) B6(0.838,2.475) B7(-0.663,2.473)
  rect 0.3x1.148 smd: A8(-1.663,2.475) B8(1.337,2.475)
  silkscreen extent -4.38,-5.08 4.56,2.75
WIRELM-SMD_ESP32-S3-WROOM-1 [mm]
  rect 1.5x0.9 smd: 1(-8.75,8.895) 2(-8.75,7.625) 3(-8.75,6.355) 4(-8.75,5.085) 5(-8.75,3.815) 6(-8.75,2.545) 7(-8.75,1.275) 8(-8.75,0.005) 9(-8.75,-1.265) 10(-8.75,-2.535) 11(-8.75,-3.805) 12(-8.75,-5.075) 13(-8.75,-6.345) 14(-8.75,-7.615) 27(8.75,-7.615) 28(8.75,-6.345) 29(8.75,-5.075) 30(8.75,-3.805) 31(8.75,-2.535) 32(8.75,-1.265) 33(8.75,0.005) 34(8.75,1.275) 35(8.75,2.545) 36(8.75,3.815) 37(8.75,5.085) 38(8.75,6.355) 39(8.75,7.625) 40(8.75,8.895)
  rect 0.9x1.5 smd: 15(-6.985,-8.895) 16(-5.715,-8.895) 17(-4.445,-8.895) 18(-3.175,-8.895) 19(-1.905,-8.895) 20(-0.635,-8.895) 21(0.635,-8.895) 22(1.905,-8.895) 23(3.175,-8.895) 24(4.445,-8.895) 25(5.715,-8.895) 26(6.985,-8.865)
  rect 0.9x0.9 smd: 41(-2.9,-0.225) 41(-2.9,1.175) 41(-2.9,2.575) 41(-1.5,2.575) 41(-1.5,-0.225) 41(-1.5,1.175) 41(-0.1,2.575) 41(-0.1,1.175) 41(-0.1,-0.225)
  silkscreen extent -9,-9.14 9.02,16.39

## Part data
C1 C2 C5 C6 C7 C12 C13 C14 C15 C16 C17 C18 C20 C21 C22 C23 C24 C26 C27 C28 C31 C32 C33 C41 C42 C43 C44: "Capacitor", LatestRevisionDate=17-Jul-2002, LatestRevisionNote="Re-released for DXP Platform.", PackageReference=RAD-0.3, Published=8-Jun-2000, Publisher="Altium Limited"
  C1 C41 C42 C43 C44: PackageDescription="Radial Cap, Thru-Hole; 2 Leads; 0.3 in Pin Spacing"
D1: library part Diode, "Default Diode", PackageDocument=Sep-1996, Code_JEDEC=DO-214-AB, LatestRevisionDate=17-Jul-2002, LatestRevisionNote="Re-released for DXP Platform.", PackageReference=SMC, Published=8-Jun-2000, Publisher="Altium Limited"
D6 D7 D8 D9 D10 D11 D12 D13 D16: Breakdown Voltage=6V, JLCPCB Part Class="Extended Part", LCSC Part Name=0521/0531，单路双向ESD静电防护器件，20kV，CJ：0.25pF；HDMI/USB/NFC/RF超高速接口通讯防护, Manufacturer=ElecSuper(静芯微), Maximum Clamping Voltage=18V, Operating Temperature=-, Peak Pulse Current (Ipp)=4A, Peak Pulse Power Dissipation (Ppp)=80W, Reverse Leakage Current (Ir)=1uA, Reverse Stand-Off Voltage (Vrwm)=5V, Add into BOM=yes, Convert to PCB=yes, Datasheet=https://atta.szlcsc.com/upload/public/pdf/source/20240905/E90AFA5EC59D44930BEC0D45A1143918.pdf, Device=RCLAMP0521T-ES, Manufacturer Part=RCLAMP0521T-ES, Number of Lines=单路, polarity=双向, Supplier=LCSC, Supplier Footprint=DFN1006-2L, Supplier Part=C5180263, Symbol=RCLAMP0521T-ES, Type=ESD
P1: library part "Header 3", "Header, 3-Pin", LatestRevisionDate=17-Jul-2002, LatestRevisionNote="Re-released for DXP Platform.", Publisher="Altium Limited"
Q5: library part MOSFET-P, "P-Channel MOSFET", PackageDocument=1995/1996, LatestRevisionDate=17-Jul-2002, LatestRevisionNote="Re-released for DXP Platform.", PackageReference=E3, Published=8-Jun-2000, Publisher="Altium Limited"
R1 R2 R3 R4 R5 R6 R7 R9 R10 R11 R20 R21 R24 R25 R26 R27 R28 R29 R30 R31 R34 R35 R36 R37 R38 R40 R43 R44 R45 R46: library part Res1, "Resistor", LatestRevisionDate=17-Jul-2002, LatestRevisionNote="Re-released for DXP Platform.", PackageReference=AXIAL-0.3, Published=8-Jun-2000, Publisher="Altium Limited"
R51 R52 R54 R55 R56: "Resistor", LatestRevisionDate=17-Jul-2002, LatestRevisionNote="Re-released for DXP Platform.", PackageDescription="Axial Device, Thru-Hole; 2 Leads; 0.3 in Pin Spacing", PackageReference=AXIAL-0.3, Published=8-Jun-2000, Publisher="Altium Limited"
U3: library part ESP32-S3
U5: library part TP4056
U9: JLCPCB Part Class="Extended Part", Add into BOM=yes, Convert to PCB=yes, Datasheet=https://atta.szlcsc.com/upload/public/pdf/source/20210715/C726001_EFE09342631EBC06FA98BEAE6CEEEE9D.pdf, Device=ICM-20948, LCSC Part Name=ICM-20948, Manufacturer Part=ICM-20948, Supplier=LCSC, Supplier Footprint=QFN-24(3x3), Supplier Part=C726001, Symbol=ICM-20948
U10: library part RT9013-18GB_C22435116, JLCPCB Part Class="Extended Part", Output Current=500mA, Output Voltage=1.8V, Power Supply Rejection Ratio (PSRR)=75dB@(1kHz), Voltage - Supply=7V, Add into BOM=yes, Convert to PCB=yes, Datasheet=https://atta.szlcsc.com/upload/public/pdf/source/20240521/96856EEC3938E9CD57929E5A61E5793B.pdf, Device=RT9013-18GB_C22435116, LCSC Part Name=RT9013-18GB, Manufacturer Part=RT9013-18GB, Number of Outputs=1, Supplier=LCSC, Supplier Footprint=SOT-23-5, Supplier Part=C22435116, Symbol=RT9013-18GB_C22435116
U11: JLCPCB Part Class="Extended Part", Voltage - Supply(VCCA)=1.2V~3.3V, Voltage - Supply(VCCB)=1.8V~5.5V, Add into BOM=yes, Convert to PCB=yes, Data Rate=-, Datasheet=https://www.ti.com/cn/lit/gpn/pca9306, Device=PCA9306DCUR, Input Signal=-, Manufacturer Part=PCA9306DCUR, Number of Circuits=2, Output Signal=-, Supplier=LCSC, Supplier Footprint=VSSOP-8, Supplier Part=C33196, Symbol=PCA9306DCUR
U12: JLCPCB Part Class="Extended Part", LCSC Part Name="自弹式 MicroSD卡(TF卡) 卡座", Manufacturer="XKB Connection(中国星坤)", Operating Temperature Range=-25℃~+90℃, Add into BOM=yes, Additional Card Detection Pins=-, Card Connection Mode=自弹式, Card Type=MicroSD卡(TF卡), Connector Type=卡座, Convert to PCB=yes, Datasheet=https://atta.szlcsc.com/upload/public/pdf/source/20211011/66E84C7106D817B4016DBCE6B64BEDA0.pdf, Device=XKTF-015-N, Manufacturer Part=XKTF-015-N, Maximum Body Height=2mm, Supplementary Features=-, Supplier=LCSC, Supplier Footprint=SMD, Supplier Part=C381082, Symbol=XKTF-015-N
U13: JLCPCB Part Class="Extended Part", Manufacturer=TI(德州仪器), Operating Temperature=-40℃~+85℃, Voltage - Supply(VCCA)=1.2V~3.6V, Add into BOM=yes, Channel Type=双向, Convert to PCB=yes, Data Rate=500Mbps, Datasheet=https://www.ti.com/cn/lit/gpn/sn74avc1t45, Device=SN74AVC1T45DBVR, LCSC Part Name=SN74AVC1T45DBVR, Manufacturer Part=SN74AVC1T45DBVR, Number of Circuits=1, Output Type=三态, Supplier=LCSC, Supplier Footprint=SOT-23-6, Supplier Part=C131978, Symbol=SN74AVC1T45DBVR, Voltage - Supply(VCCB)=1.2V~3.6V
U14: JLCPCB Part Class="Extended Part", Manufacturer=SGMICRO(圣邦微), Add into BOM=yes, Convert to PCB=yes, Datasheet=https://atta.szlcsc.com/upload/public/pdf/source/20230209/306941469271C3C65293AD562616D747.pdf, Device=SGM61022XTDE8G/TR, Function=降压型, LCSC Part Name=SGM61022XTDE8G/TR, Manufacturer Part=SGM61022XTDE8G/TR, Supplier=LCSC, Supplier Footprint=TDFN-8AL(2x2), Supplier Part=C5153652, Symbol=SGM61022XTDE8G/TR, Synchronous Rectifier=是
USB1: library part USB_TYPEC
X1: library part X321532768KGD2SI, JLCPCB Part Class="Extended Part", Load Capacitance=12.5pF, Add into BOM=yes, Convert to PCB=yes, Datasheet=https://atta.szlcsc.com/upload/public/pdf/source/20240329/3A7650FD985DD0DE85694D3785AB4916.pdf, Device=X321532768KGD2SI, Manufacturer Part=X321532768KGD2SI, Supplier=LCSC, Supplier Footprint=SMD3215-2P, Supplier Part=C620155, Symbol=X321532768KGD2SI
L1: Code_IEC=1005, Code_JEITA=0402, LatestRevisionDate=29-May-2009, LatestRevisionNote="IPC-7351 Footprint Added.", PackageDescription="Chip Inductor", PackageReference=0402-A, Published=8-Jun-2000, Publisher="Altium Limited"

## Free pads (board coordinates)
  round 5 hole 3: 0(85.42,114.681) 1(85.649,80.442) 2(123.51,80.393) 3(123.123,114.942)

## Via types
v1: diameter 0.559, hole 0.305, Top Layer to Bottom Layer, tented both sides, 79 vias
v2: diameter 0.605, hole 0.3, Top Layer to Bottom Layer, tented both sides, 57 vias
v3: diameter 0.9, hole 0.5, Top Layer to Bottom Layer, tented both sides, 6 vias
v4: diameter 0.605, hole 0.305, Top Layer to Bottom Layer, tented both sides, 5 vias
v5: diameter 1.27, hole 0.711, Top Layer to Bottom Layer, tented both sides, 3 vias

## Nets (pads, with @x,y where several pads share a name; then routed paths per layer and width w, separated by ;. In a path a pad name is that pad's centre, name@x,y a point inside that pad or via, vN(x,y) a via of type N, cw(c..) or ccw(c..) an arc to the next point about the centre after c; other vN are vias at no path point)
1.8V: 1.8V.TP C22.2 C24.2 C27.1 C28.1 R37.1 R38.1 U9.8 U9.13 U9.22 U10.5 U11.2 U13.6 | length 18.3
  Top Layer w0.219: U9.22@97.303,81.746 102.32,81.746 v2(102.616,82.042) 102.81,82.236 U11.2@102.81,83.392
  Top Layer w0.22: v2(92.659,82.931) 93.444,82.146 U9.8@94.213,82.146 ; v1@93.661,78.247 94.758,79.344 U9.13@94.758,80.001 ; R38.1@101.907,85.298 R38.1@102.154,85.051
  Top Layer w0.254: U13.6@91.645,83.037 91.75,82.931 v2(92.659,82.931)
  Top Layer w0.381: v1(93.646,78.263) v1@93.661,78.247
  Top Layer w0.508: v2(101.907,86.107) 102.019,85.995 102.019,85.41
  Bottom Layer w0.254: C22.2@91.001,82.944 91.007,82.937 92.653,82.937 v2(92.659,82.931) ; v1(93.646,78.263) 93.646,79.288 93.789,79.431 C24.2@93.876,79.431
  Bottom Layer w0.381: C27.1@100.568,85.051 100.602,85.086 100.602,85.85 100.859,86.107 v2(101.907,86.107)
  Bottom Layer w0.6: v2(102.616,82.042) v2@102.616,82.043
  other v1: 98.196,83.896
3.3V: 3.3v.TP C1.2 C2.2 C5.1 C6.1 C12.2 C16.2 C18.2 C26.1 C31.2 C32.2 C43.1 C44.1 L1.2 R2.1 R5.1 R6.2 R7.2 R9.2 R10.2 R20.1 R26.2 R29.2 R30.2 R34.1 R35.1 R36.2 R43.1 R44.1 R45.1 R46.1 R51.1 R56.1 U3.2 U7.1 U7.2 U8.3 U10.1 U10.3 U12.4 U13.1 U14.5 U15.3 U15.7 | length 55.8
  Top Layer w0.254: U3.2@89.831,91.632 U3.2@90.014,91.45 ; v2(98.45,112.956) 99.238,113.744 99.238,114.411 U15.3@99.236,114.414 ; U15.7@99.749,116.177 U15.7@99.736,116.164 99.736,116.274 100.039,116.577 C1.2@101.278,116.577 ; C1.2@101.261,116.561 C1.2@101.278,116.577 ; C1.2@101.357,116.656 C1.2@101.278,116.577 ; C2.2@102.092,115.083 C2.2@102.129,115.119 ; R20.1@107.029,113.154 106.991,113.191 R20.1@107.07,113.27 ; v1(107.758,80.391) 107.758,81.846 107.959,82.046 U8.3@108.736,82.046 ; 109.425,111.754 109.51,111.669 ; R56.1@110.18,97.843 110.323,97.986 110.323,98.614 110.96,99.251 L1.2@114.059,99.251 ; U7.2@116.278,113.434 116.332,113.434 U7.2@116.505,113.261
  Top Layer w0.5: v1(89.789,89.697) U3.2@89.789,91.55 ; U13.1@91.645,85.737 93.4,85.737 93.956,86.293 v1(93.972,86.293) ; U10.3@105.948,88.506 U10.3@106.198,88.506 ; U10.3@105.948,88.511 108.86,88.511 109.297,88.075 109.297,87.169 ; 108.24,86.131 109.278,87.169
  Top Layer w0.508: R20.1@107.013,113.191 R20.1@107.045,113.223 ; R6.2@113.804,110.432 116.055,110.432 116.505,110.882 U7.2@116.505,113.261 ; U7.2@116.332,113.434 116.378,113.48 117.462,113.48 117.834,113.852 v4(117.834,115.016) ; 117.807,113.826 117.834,113.826
  Bottom Layer w0.254: C6.1@89.739,88.122 C6.1@89.81,88.193 ; C6.1@89.765,88.227 C6.1@89.8,88.261 ; v1(89.789,89.697) v1@89.8,89.687 ; R9.2@93.451,87.582 93.451,86.814 v1(93.972,86.293) ; v1(97.934,78.362) v1@97.952,78.344 ; R35.1@99.252,78.344 R35.1@99.27,78.327 ; R10.2@107.916,89.915 R10.2@107.966,89.865 ; R29.2@112.937,80.527 R29.2@113.08,80.384 ; C16.2@118.879,115.016 C16.2@118.957,115.095 C16.2@118.957,114.97
  Bottom Layer w0.5: v1@86.237,88.209 v1(86.226,88.198) C5.1@88.063,88.198 ; C5.1@88.052,88.209 C5.1@88.063,88.198 ; C6.1@89.765,88.227 89.736,88.198 C5.1@88.063,88.198 ; C6.1@89.8,88.261 v1@89.8,89.687 ; v1(93.62,107.086) 96.443,109.91 R45.1@97.138,109.91 ; v1(103.778,99.72) 104.767,99.72 104.78,99.707 R46.1@108.465,99.707 ; C31.2@106.849,99.91 U12.4@106.849,102.65
  Bottom Layer w0.508: v1(95.453,105.199) R43.1@97.024,105.199 ; v1(95.815,106.897) 96.665,107.747 R44.1@97.16,107.747 ; R10.2@107.966,89.865 v1(109.274,89.865)
  Bottom Layer w0.762: C26.1@107.917,85.899 107.936,85.88 107.936,84.723 v1(107.95,84.709)
  other v1: 106.299,78.151 107.823,78.151
  other v2: 115.727,80.943 125.09,98.503 125.09,99.472 125.09,100.344 101.734,114.196 93.885,115.163 105.467,115.645 106.6,115.645 107.724,115.645 108.832,115.65
5V: C41.2 C42.2 D1.1 Q5.3 R54.2 U6.1 U14.8 | length 18.8
  Top Layer w0.762: v1@91.815,112.588 91.815,113.944 91.834,113.963 U6.1@91.846,113.963
  Bottom Layer w0.508: v1(91.846,112.675) 96.438,112.675 98.182,110.931 103.623,110.931 104.346,111.654 106.599,111.654 v5(107.765,110.487)
  other v2: 110.525,91.734 116.505,91.734 115.951,92.481
ACC_INT1: U3.22 U15.5 | length 23.7
  Top Layer w0.254: U15.5@99.861,115.039 100.488,115.039 100.786,114.741 100.786,113.027 101.56,112.252 v2(101.56,112.203) ; U3.22@106.351,102.287 106.38,102.316 107.342,102.316 107.661,102.635 v2(107.661,108.702)
  Bottom Layer w0.254: v2(101.56,112.203) 103.239,112.203 103.668,112.632 108.468,112.632 109.274,111.826 109.274,109.95 108.557,109.232 108.192,109.232 v2(107.661,108.702)
BAT_INT: R30.1 U3.5 U8.5 | length 49.6
  Top Layer w0.254: v1(86.452,83.812) 86.452,85.787 89.558,88.893 92.04,88.893 93.641,90.495 U3.5@93.641,91.632 U3.5@93.318,91.309 ; U8.5@111.736,81.546 111.736,80.614 110.835,79.713 R30.1@110.835,79.588 111.809,79.588 112.545,78.852 v1(112.545,77.874)
  Bottom Layer w0.254: v1(86.452,83.812) 87.258,83.812 88.594,82.477 88.594,78.402 89.831,77.164 111.835,77.164 v1(112.545,77.874)
CHIP_PU: C7.1 R9.1 U3.3 | length 5
  Top Layer w0.254: U3.3@91.101,91.632 91.101,90.574 v2(91.552,90.123) v2@91.552,90.028
  Bottom Layer w0.254: v2(91.552,90.123) 91.552,90.028 91.79,89.791 C7.1@91.79,88.683 91.801,88.672 R9.1@93.451,88.672
D_N: D12.2 U3.13 USB1.A7 USB1.B7 | length 40.6
  Top Layer w0.152: U3.13@103.801,91.632 103.801,91.332 104.175,90.958 104.195,90.958 104.284,90.869 104.284,90.527 104.718,90.094 107.792,90.094 109.404,91.706 109.404,99.841 110.27,100.707 110.27,106.055 110.76,106.545 115.505,106.545 D12.2@116.155,105.894 116.155,106.036 116.617,106.498 116.941,106.498 v1(117.172,106.268) 117.172,106.29 117.379,106.498 117.585,106.498 118.177,105.907 USB1.B7@119.503,105.907 ; USB1.A7@119.791,106.907 USB1.A7@119.795,106.903 120.705,106.903 121.024,107.222 v1(121.104,107.222)
  Bottom Layer w0.152: v1(117.172,106.268) 116.943,106.496 116.643,106.496 116.446,106.3 116.446,105.935 116.736,105.646 117.359,105.646 118.522,106.809 120.691,106.809 v1(121.104,107.222)
D_P: D13.2 U3.14 USB1.A6 USB1.B6 | length 41
  Top Layer w0.152: U3.14@105.071,91.632 105.071,91.332 104.698,90.958 104.678,90.958 104.589,90.869 104.589,90.654 104.844,90.399 107.666,90.399 109.1,91.832 109.1,99.967 109.965,100.833 109.965,106.181 110.634,106.85 115.598,106.85 D13.2@116.155,107.407 116.155,107.26 116.612,106.803 116.945,106.803 v1(117.172,107.03) 117.398,106.803 117.568,106.803 118.172,107.407 USB1.B6@119.507,107.407 ; USB1.A6@119.79,106.407 USB1.A6@119.793,106.403 120.742,106.403 120.989,106.156 v1(121.099,106.156)
  Bottom Layer w0.152: v1(117.172,107.03) 116.943,106.801 116.517,106.801 116.142,106.426 116.142,105.809 116.609,105.341 117.485,105.341 118.649,106.505 120.729,106.505 121.077,106.156 v1(121.099,106.156)